# Altium PCB PCB.PcbDoc (part 1 of 2)
Units mm, origin at the board's own origin, x right, y up, seen from the top; angles counter-clockwise.
Board outline 90 x 38 mm, 2 copper layers (Top Layer, Bottom Layer), stack 1.499 mm thick; 46 components, 39 nets, 189 pads, 43 vias.
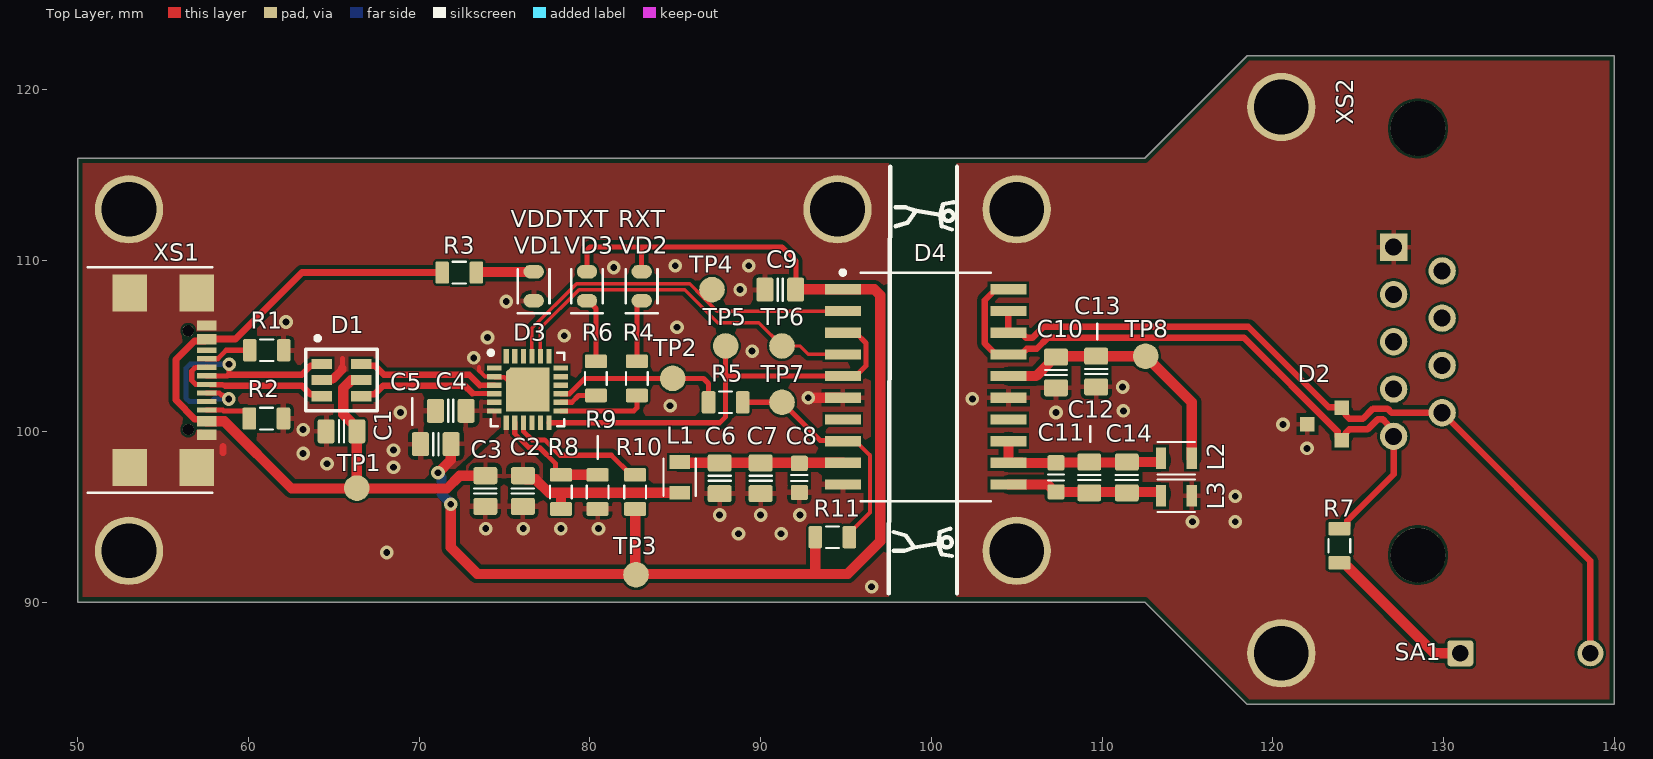
[diagram p0: Top Layer view]
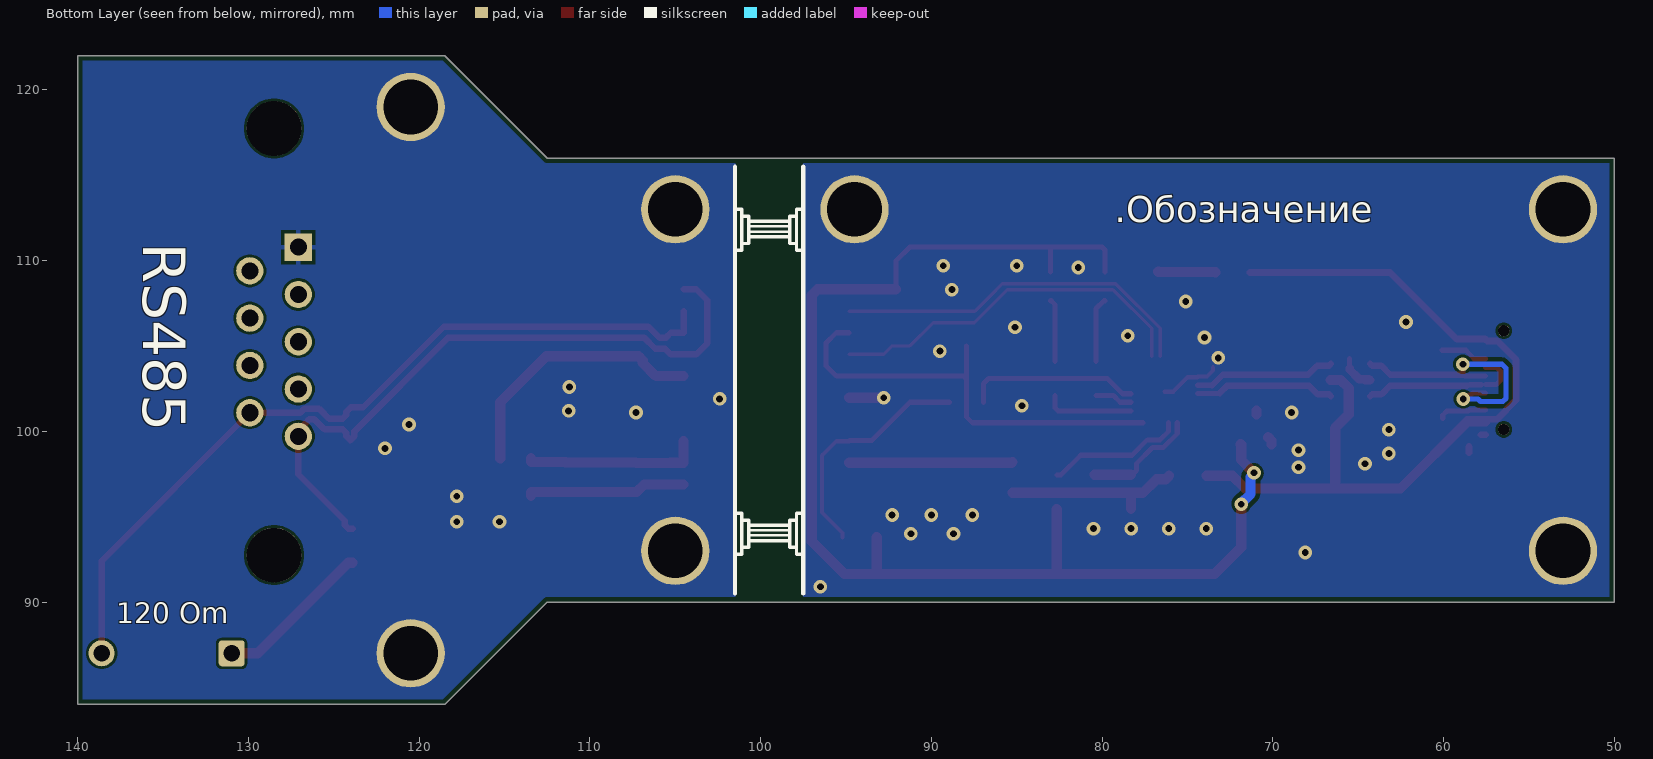
[diagram p1: Bottom Layer view, seen from below]
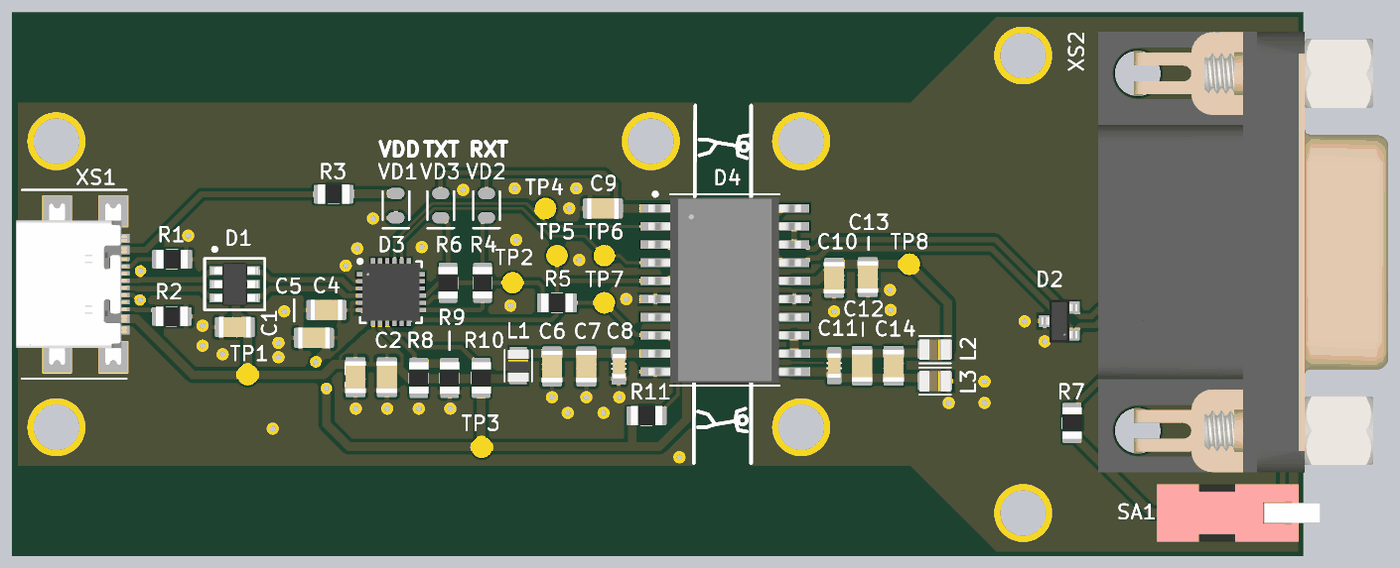
[diagram p2: 3D render of the assembled board from above, using the file's embedded part models]

## Layer stack, top to bottom
Top Solder: solder mask 0.0102, Solder Resist, Dk 3.5
Top Layer: signal copper 0.0175
Dielectric 1: dielectric 1.464, FR-4, Dk 4.8
Bottom Layer: signal copper 0.0175
Bottom Solder: solder mask 0.0102, Solder Resist, Dk 3.5

## Board outline
50,90 50,116 112.5,116 118.5,122 140,122 140,84 118.5,84 112.5,90

## Design rules (kind name [scope] priority, off if disabled: settings)
BoardOutlineClearance [All] p1: gap=0.3 ignorepadtopadclearanceinfootprint=FALSE
Clearance Clearance_1 [InNet('GND') And OnMid vs OnMid] p1: gap=0.15 ignorepadtopadclearanceinfootprint=FALSE except(0.2: Hole-Hole; 0.25: Arc-Fill Arc-Poly Arc-Region Track-Fill Track-Poly Track-Region Fill-Text Poly-Text Region-Text) sourcerule=63 cellrowname=GND cellrowtype=1 cellcolname=All cellcoltype=0 innerlayers=TRUE
Clearance Clearance_2 [InNet('GND') And (ExistsOnLayer('Top Layer') Or ExistsOnLayer('Bottom Layer')) vs (ExistsOnLayer('Top Layer') Or ExistsOnLayer('Bottom Layer'))] p2: gap=0.15 ignorepadtopadclearanceinfootprint=FALSE except(0.2: Hole-Hole; 0.25: Arc-Fill Arc-Poly Arc-Region Track-Fill Track-Poly Track-Region Fill-Text Poly-Text Region-Text) sourcerule=63 cellrowname=GND cellrowtype=1 cellcolname=All cellcoltype=0 outerlayers=TRUE
Clearance Clearance_3 [InNet('GND')] p3: gap=0.254 ignorepadtopadclearanceinfootprint=FALSE sourcerule=63 cellrowname=GND cellrowtype=1 cellcolname=All cellcoltype=0
Clearance Clearance_1 [InNet('GND_ISO') And OnMid vs OnMid] p4: gap=0.15 ignorepadtopadclearanceinfootprint=FALSE except(0.2: Hole-Hole; 0.25: Arc-Fill Arc-Poly Arc-Region Track-Fill Track-Poly Track-Region Fill-Text Poly-Text Region-Text) sourcerule=63 cellrowname=GND_ISO cellrowtype=1 cellcolname=All cellcoltype=0 innerlayers=TRUE
Clearance Clearance_2 [InNet('GND_ISO') And (ExistsOnLayer('Top Layer') Or ExistsOnLayer('Bottom Layer')) vs (ExistsOnLayer('Top Layer') Or ExistsOnLayer('Bottom Layer'))] p5: gap=0.15 ignorepadtopadclearanceinfootprint=FALSE except(0.2: Hole-Hole; 0.25: Arc-Fill Arc-Poly Arc-Region Track-Fill Track-Poly Track-Region Fill-Text Poly-Text Region-Text) sourcerule=63 cellrowname=GND_ISO cellrowtype=1 cellcolname=All cellcoltype=0 outerlayers=TRUE
Clearance Clearance_3 [InNet('GND_ISO')] p6: gap=0.254 ignorepadtopadclearanceinfootprint=FALSE sourcerule=63 cellrowname=GND_ISO cellrowtype=1 cellcolname=All cellcoltype=0
Clearance Clearance_1 [OnMid vs OnMid] p7: gap=0.15 ignorepadtopadclearanceinfootprint=FALSE sourcerule=63 cellrowname=All cellrowtype=0 cellcolname=All cellcoltype=0 innerlayers=TRUE
Clearance Clearance_2 [(ExistsOnLayer('Top Layer') Or ExistsOnLayer('Bottom Layer')) vs (ExistsOnLayer('Top Layer') Or ExistsOnLayer('Bottom Layer'))] p8: gap=0.15 ignorepadtopadclearanceinfootprint=FALSE sourcerule=63 cellrowname=All cellrowtype=0 cellcolname=All cellcoltype=0 outerlayers=TRUE
Clearance [All] p9: gap=0.254 ignorepadtopadclearanceinfootprint=FALSE ismatrix=TRUE miname0=GND mitype0=1 miname1=GND_ISO mitype1=1
DiffPairsRouting "Schematic Differential Pairs Routing_1" [InDifferentialPair('D_USB_D')] p1: maxlimit=0.254 minlimit=0.15 mostfreqgap=0.254 toplayer_minwidth=0.3 toplayer_maxwidth=0.381 toplayer_prefwidth=0.381 bottomlayer_minwidth=0.3 bottomlayer_maxwidth=0.381 bottomlayer_prefwidth=0.381 maxuncoupledlength=12.7
DiffPairsRouting "Schematic Differential Pairs Routing" [InDifferentialPair('D_D')] p2: maxlimit=0.254 minlimit=0.15 mostfreqgap=0.254 toplayer_minwidth=0.15 toplayer_maxwidth=0.381 toplayer_prefwidth=0.381 bottomlayer_minwidth=0.15 bottomlayer_maxwidth=0.381 bottomlayer_prefwidth=0.381 maxuncoupledlength=12.7
DiffPairsRouting [All] p3: maxlimit=0.254 minlimit=0.254 mostfreqgap=0.254 toplayer_minwidth=0.381 toplayer_maxwidth=0.381 toplayer_prefwidth=0.381 bottomlayer_minwidth=0.381 bottomlayer_maxwidth=0.381 bottomlayer_prefwidth=0.381 maxuncoupledlength=12.7
HoleSize [All] p1: absolutevalues=TRUE maxlimit=3.5 minlimit=0.3 maxpercent=80.000 minpercent=20.000
HoleToHoleClearance [All] p1: gap=0.2 allowstackedmicrovias=TRUE
MatchedLengths "Schematic Matched Net Lengths" [InDifferentialPair('D_USB_D')] p1: tolerance=10 checknetsindiffpair=TRUE checkdiffpairvsdiffpair=FALSE checkxsignals=FALSE checkothers=FALSE
MatchedLengths "Schematic Matched Net Lengths_1" [InDifferentialPair('D_D')] p2: tolerance=4 checknetsindiffpair=TRUE checkdiffpairvsdiffpair=FALSE checkxsignals=FALSE checkothers=FALSE
MatchedLengths "Schematic Matched Net Lengths_2" [InDifferentialPair('D_RS485')] p3: tolerance=10 checknetsindiffpair=TRUE checkdiffpairvsdiffpair=FALSE checkxsignals=FALSE checkothers=FALSE
MaxMinImpedance "Schematic Impedance Constraint_1" [InDifferentialPair('D_USB_D')] p1: minimum=81.00 maximum=99.00
MaxMinImpedance "Schematic Impedance Constraint" [InDifferentialPair('D_D')] p2: minimum=81.00 maximum=99.00
MaxMinImpedance "Schematic Impedance Constraint_2" [InDifferentialPair('D_RS485')] p3: minimum=108.0 maximum=132.0
MinimumSolderMaskSliver [All] p1: minsoldermaskwidth=0.1
PolygonConnect "Schematic Polygon Connect Style_2" [InNet('EN_DC')] p1: connectstyle=Relief reliefconductorwidth=0.3 reliefentries=4 polygonreliefangle="90 Angle" airgapwidth=0.2
PolygonConnect "Schematic Polygon Connect Style_1" [InNet('GND')] p2: thpad.connectstyle=Relief thpad.reliefconductorwidth=0.3 thpad.reliefentries=4 thpad.polygonreliefangle="90 Angle" thpad.airgapwidth=0.2 smdpad.connectstyle=Relief smdpad.reliefconductorwidth=0.3 smdpad.reliefentries=4 smdpad.polygonreliefangle="90 Angle" smdpad.airgapwidth=0.2 via.connectstyle=Direct via.reliefconductorwidth=0.254 via.reliefentries=4 via.polygonreliefangle="90 Angle" via.airgapwidth=0.254
PolygonConnect "Schematic Polygon Connect Style" [InNet('GND_ISO')] p3: thpad.connectstyle=Relief thpad.reliefconductorwidth=0.3 thpad.reliefentries=4 thpad.polygonreliefangle="90 Angle" thpad.airgapwidth=0.2 smdpad.connectstyle=Relief smdpad.reliefconductorwidth=0.3 smdpad.reliefentries=4 smdpad.polygonreliefangle="90 Angle" smdpad.airgapwidth=0.2 via.connectstyle=Direct via.reliefconductorwidth=0.254 via.reliefentries=4 via.polygonreliefangle="90 Angle" via.airgapwidth=0.254
PolygonConnect [All] p4: connectstyle=Relief reliefconductorwidth=0.254 reliefentries=4 polygonreliefangle="90 Angle" airgapwidth=0.254
RoutingVias [All] p1: holewidth=0.4 width=0.8 viastyle="Through Hole" minholewidth=0.4 minwidth=0.8 maxholewidth=0.4 maxwidth=0.8
SilkToSilkClearance [All] p1: silktosilkclearance=0.15
SilkToSolderMaskClearance [IsPad] p1: minsilkscreentomaskgap=0.15 clearancetoexposedcopper=TRUE
SolderMaskExpansion [All] p1: expansion=0.025 istentingtop=FALSE
Width "Schematic Width Constraint_1" [InNet('EN_DC')] p1: maxlimit=0.5 minlimit=0.15 preferedwidth=0.3 minimp=50.000000 maximp=50.000000 favimp=50.000000
Width "Schematic Width Constraint_8" [InNet('NetC11_1')] p2: maxlimit=0.6 minlimit=0.15 preferedwidth=0.3 minimp=50.000000 maximp=50.000000 favimp=50.000000
Width "Schematic Width Constraint_6" [InNet('GND')] p3: maxlimit=0.6 minlimit=0.25 preferedwidth=0.4 minimp=50.000000 maximp=50.000000 favimp=50.000000
Width "Schematic Width Constraint_7" [InNet('GND_ISO')] p4: maxlimit=0.25 minlimit=0.25 preferedwidth=0.25 minimp=50.000000 maximp=50.000000 favimp=50.000000
Width "Schematic Width Constraint_5" [InNet('TXD')] p5: maxlimit=0.6 minlimit=0.2 preferedwidth=0.3 minimp=50.000000 maximp=50.000000 favimp=50.000000
Width "Schematic Width Constraint_4" [InNet('RXD')] p6: maxlimit=0.6 minlimit=0.2 preferedwidth=0.3 minimp=50.000000 maximp=50.000000 favimp=50.000000
Width "Schematic Width Constraint_3" [InNet('VBUS')] p7: maxlimit=0.6 minlimit=0.15 preferedwidth=0.4 minimp=50.000000 maximp=50.000000 favimp=50.000000
Width "Schematic Width Constraint_2" [InNet('VBUS_D')] p8: maxlimit=0.6 minlimit=0.2 preferedwidth=0.3 minimp=50.000000 maximp=50.000000 favimp=50.000000
Width "Schematic Width Constraint" [InNet('Visoout')] p9: maxlimit=0.6 minlimit=0.2 preferedwidth=0.4 minimp=50.000000 maximp=50.000000 favimp=50.000000
Width [All] p10: maxlimit=0.6 minlimit=0.15 preferedwidth=0.3 minimp=50.000000 maximp=50.000000 favimp=50.000000
24 further rules are at their usual default settings.

## Classes and differential pairs
polygon class GND: GND_L02_P002
polygon class Power: VBUS_L01_P000
component class U_USB_to_UART: C6 C7 C8 C9 C10 C11 C12 C13 C14 D4 L1 L2 L3 R11
component class U_USBtoUART: C2 C3 C4 C5 D3 R8 R9 R10
component class MAIN: C1 D1 D2 R1 R2 R3 R4 R5 R6 R7 SA1 TP1 TP2 TP3 TP4 TP5 TP6 TP7 TP8 VD1 VD2 VD3 XS1 XS2
differential pair D_USB_D: +USB_D_P -USB_D_N
differential pair D_D: +D_P -D_N
differential pair D_RS485: +RS485_P -RS485_N

## Components (designator, comment, footprint, x,y, rotation, side; value= is the part's Value field where it differs from the comment)
C1 "100 нФ" CAPC2012X135N 65.45,100 r0 top value=100n
C2 "100 нФ" CAPC2012X135N 76.075,96.5 r90 top value=100n
C3 "4,7 мкФ" CAPC2012X135N 73.875,96.5 r90 top value=4.7u
C4 "100 нФ" CAPC2012X135N 71.85,101.2 r0 top value=100n
C5 "4,7 мкФ" CAPC2012X135N 70.975,99.25 r0 top value=4.7u
C6 "10 мкФ" CAPC2012X135N 87.599,97.25 r90 top value=10u
C7 "1 мкФ" CAPC2012X135N 89.999,97.25 r90 top value=1u
C8 "10 нФ" CAPC1608X90N 92.268,97.269 r90 top value=10n
C9 "100 нФ" CAPC2012X135N 91.15,108.3 r0 top value=100n
C10 "100 нФ" CAPC2012X135N 107.299,103.45 r90 top value=100n
C11 "10 нФ" CAPC1608X90N 107.3,97.3 r90 top value=10n
C12 "1 мкФ" CAPC2012X135N 109.25,97.3 r90 top value=1u
C13 "10 мкФ" CAPC2012X135N 109.65,103.5 r90 top value=10u
C14 "10 мкФ" CAPC2012X135N 111.45,97.3 r90 top value=10u
D1 "USBLC6-2SC6" ST_SOT23-6L 65.45,103 r0 top
D2 "CDSOT23-SM712" BOURNS_CDSOT23_SM712 123.025,100.425 r90 top
D3 "CP2102N-A02-GQFN24" CP2102N-A02-GQFN24_DS15 76.35,102.45 r0 top
D4 "ISOW1432DFMR" TI_DFM0020A 99.666,102.6 r0 top
L1 "600 Ом @ 100 МГц" TDK_MPZ2012S_2012 85.25,97.3 r270 top
L2 "330 Ом @ 100 МГц" Murata_BLM21PG_2012_Reflow 114.35,98.425 r180 top
L3 "330 Ом @ 100 МГц" Murata_BLM21PG_2012_Reflow 114.35,96.225 r180 top
R1 "5,1 кОм" RESC2012X70N 61.075,104.75 r0 top value=5.1k
R2 "5,1 кОм" RESC2012X70N 61.05,100.75 r180 top value=5.1k
R3 "330 Ом" RESC2012X70N 72.35,109.3 r0 top value=330R
R4 "10 кОм" RESC2012X70N 82.75,103.1 r90 top value=10k
R5 "0 Ом" RESC2012X70N 87.95,101.7 r0 top value=0R
R6 "10 кОм" RESC2012X70N 80.35,103.1 r90 top value=10k
R7 "120 Ом" RESC2012X70N 123.9,93.3 r90 top value=120R
R8 "22 кОм" RESC2012X70N 78.3,96.45 r270 top value=22k
R9 "47 кОм" RESC2012X70N 80.45,96.45 r90 top value=47k
R10 "1 кОм" RESC2012X70N 82.65,96.45 r270 top value=1k
R11 "4,7 кОм" RESC2012X70N 94.2,93.8 r180 top value=4.7k
SA1 "DS1040-01RT" CONNFLY_DS1040_01RT 134.79,87 r90 top
TP1 "D1.5mm" TestPoint_Pad_D1.5mm 66.35,96.675 r0 top
TP2 "D1.5mm" TestPoint_Pad_D1.5mm 84.85,103.1 r90 top
TP3 "D1.5mm" TestPoint_Pad_D1.5mm 82.7,91.6 r90 top
TP4 "D1.5mm" TestPoint_Pad_D1.5mm 87.15,108.3 r90 top
TP5 "D1.5mm" TestPoint_Pad_D1.5mm 87.95,105 r90 top
TP6 "D1.5mm" TestPoint_Pad_D1.5mm 91.25,105 r90 top
TP7 "D1.5mm" TestPoint_Pad_D1.5mm 91.25,101.7 r90 top
TP8 "D1.5mm" TestPoint_Pad_D1.5mm 112.55,104.4 r90 top
VD1 "TO-2013BC-PG" LED_OA2013_080_090_1C2A 76.705,108.5 r270 top
VD2 "TO-2013BC-PG" LED_OA2013_080_090_1C2A 83.03,108.5 r270 top
VD3 "TO-2013BC-PG" LED_OA2013_080_090_1C2A 79.83,108.5 r270 top
XS1 "USB Type-C" USB4110-GF-A_GCT 54.187,103 r270 top
XS2 "D-SUB 9F" CONNFLY_DS1037_01_09F 128.5,105.245 r90 top

## Footprints (in the part's own frame and the unit in brackets; to place one, negate y for a bottom-side part, rotate by r counter-clockwise, add the part's x,y. Pads: shape width x height; smd on the part's side, far side on the other; paste and mask are expansions set on the pad)
BOURNS_CDSOT23_SM712 [mm] "Bourns CDSOT23-SM712 datasheet land pattern; pads0.85x0.85mm, rows2.0mm, pitch1.90mm; UL STEP"
  rect 0.85x0.85 smd paste+0 mask+0.05: 1(-0.95,-1) 2(0.95,-1) 3(0,1)
  body extent -1.5,-1.24 1.5,1.24, height 1.17
CAPC1608X90N [mm] "Chip Capacitor, Body 1.6x0.8mm, EIA 0603, IPC Medium Density"
  round 0.254 on Mech15: 0(0,0)
  rrect25% 0.9x1 smd: 1(-0.85,0) 2(0.85,0)
  Top Layer pour cut-out: -0.6,0.5 -0.4,0.7 0.4,0.7 0.6,0.5 0.6,-0.5 0.4,-0.7 -0.4,-0.7 -0.6,-0.5
  silkscreen extent -0.18,-0.48 0.18,0.48, body extent -0.85,-0.45 0.85,0.45, height 0.89
CAPC2012X135N [mm] "Chip Capacitor, Body 2.0x1.2mm, EIA 0805, IPC Medium Density"
  round 0.254 on Mech15: 0(0,0)
  rrect25% 1x1.4 smd: 1(-0.9,0) 2(0.9,0)
  Top Layer pour cut-out: -0.675,0.7 -0.475,0.9 0.475,0.9 0.675,0.7 0.675,-0.7 0.475,-0.9 -0.475,-0.9 -0.675,-0.7
  silkscreen extent -0.15,-0.65 0.15,0.65, body extent -1.1,-0.72 1.1,0.73, height 1.34
CONNFLY_DS1037_01_09F [mm] "CONNFLY DS1037-01-09F female right angle 9.4mm; PTH1.0 pads1.6 pitch2.77x2.84; NPTH3.2 spacing24.99; user STEP"
  rect 1.6x1.6 hole 1 paste-2539.97 mask+0.05: 1(5.54,1.42)
  round 1.6 hole 1 paste-2539.97 mask+0.05: 2(2.77,1.42) 3(0,1.42) 4(-2.77,1.42) 5(-5.54,1.42) 6(4.155,-1.42) 7(1.385,-1.42) 8(-1.385,-1.42) 9(-4.155,-1.42)
  round 3.2 hole 3.2 unplated paste-2539.97 mask+0.05: ""(-12.495,0) ""(12.495,0)
  body extent -15.4,-17.49 15.4,2.76, height 12.5
CONNFLY_DS1040_01RT [mil] "Connfly DS1040-01RT piano SPST; pitch7.62mm PTH0.97mm pad1.524mm; EasyEDA STEP approximate height8.8 vs drawing8.0mm"
  rrect25% 60x60 hole 38.19 paste-99999 mask+1.97: 1(0,150)
  round 60 hole 38.19 paste-99999 mask+1.97: 2(0,-150)
  body extent -79,-254 79,195, height 346
CP2102N-A02-GQFN24_DS15 [mm] "User derivative of official UL A01 export; CP2102N-A02 QFN24 datasheet Rev1.5 Fig7.2; EP25 C0.25"
  rect 0.85x0.3 smd paste+0 mask+0.06: 1(-1.95,1.25) 2(-1.95,0.75) 3(-1.95,0.25) 4(-1.95,-0.25) 5(-1.95,-0.75) 6(-1.95,-1.25) 13(1.95,-1.25) 14(1.95,-0.75) 15(1.95,-0.25) 16(1.95,0.25) 17(1.95,0.75) 18(1.95,1.25)
  rect 0.3x0.85 smd paste+0 mask+0.06: 7(-1.25,-1.95) 8(-0.75,-1.95) 9(-0.25,-1.95) 10(0.25,-1.95) 11(0.75,-1.95) 12(1.25,-1.95) 19(1.25,1.95) 20(0.75,1.95) 21(0.25,1.95) 22(-0.25,1.95) 23(-0.75,1.95) 24(-1.25,1.95)
  rect 0.354x0.354 smd rot 45 paste-2 mask+0.06: 25(-1.025,1.025)
  rect 2.55x2.3 smd paste-2 mask+0.06: 25(0,-0.125)
  rect 2.3x2.55 smd paste-2 mask+0.06: 25(0.125,0)
  silkscreen extent -2.27,-2.15 2.15,2.27, body extent -2,-2 2,2, height 0.8
LED_OA2013_080_090_1C2A [mm] "manufacturer recommended; PG/MRE 2017; pad 0.8x1.2 gap 0.9mm; 1=K right 2=A left; generic standard 3D, not exact Oasistek"
  oval 0.8x1.2 smd paste+0 mask+0.05: 1(0.85,0) 2(-0.85,0)
  silkscreen extent -1,-0.93 1.58,0.93, body extent -1,-0.63 1,0.63, height 0.8
Murata_BLM21PG_2012_Reflow [mm] "Murata BLM21PG; reflow land pattern 0.6x1.25mm gap1.2mm; check current-dependent feed copper in ENFA0005 section12.1"
  rect 0.6x1.25 smd paste+0 mask+0.05: 1(-0.9,0) 2(0.9,0)
  silkscreen extent -1.1,-0.95 1.1,0.95, body extent -1.1,-0.72 1.1,0.72, height 1.05
RESC2012X70N [mm] "Chip Resistor, Body 2.0x1.2mm, EIA 0805, IPC Medium Density"
  round 0.254 on Mech15: 0(0,0)
  rrect25% 0.8x1.3 smd: 1(-1,0) 2(1,0)
  Top Layer pour cut-out: -0.725,0.65 -0.525,0.85 0.525,0.85 0.725,0.65 0.725,-0.65 0.525,-0.85 -0.525,-0.85 -0.725,-0.65
  silkscreen extent -0.38,-0.64 0.38,0.64, body extent -1.1,-0.67 1.1,0.68, height 0.69
ST_SOT23-6L [mm] "SOT23, 6-Leads, Body 2.93x2.80mm, Pitch 0.95mm, IPC Medium Density"
  rect 1.2x0.6 smd: 1(-1.15,0.95) 2(-1.15,0) 3(-1.15,-0.95) 4(1.15,-0.95) 5(1.15,0) 6(1.15,0.95)
  silkscreen extent -2.1,-1.8 2.1,2.57, body extent -1.6,-1.53 1.6,1.53, height 1.45
TDK_MPZ2012S_2012 [mm] "TDK MPZ2012S; reflow land pattern 0.8x1.2mm gap1.0mm; UL STEP height1.10mm (datasheet max1.05mm)"
  rect 0.8x1.2 smd paste+0 mask+0.05: 1(-0.9,0) 2(0.9,0)
  silkscreen extent -1.1,-0.95 1.1,0.95, body extent -1.1,-0.72 1.1,0.72, height 1.1
TestPoint_Pad_D1.5mm [mm] "Test point; round copper pad D1.5mm; exposed mask; no paste, drill or silkscreen; Standard (No BOM)"
  round 1.5 smd paste-1.5 mask+0.05: 1(0,0)
TI_DFM0020A [mm] "TI DFM0020A SOIC20 for ISOW1432DFMR; TI land pattern 2.1x0.6mm, pitch1.27mm, rows9.7mm"
  rect 2.1x0.6 smd paste+0 mask+0.05: 1(-4.85,5.715) 2(-4.85,4.445) 3(-4.85,3.175) 4(-4.85,1.905) 5(-4.85,0.635) 6(-4.85,-0.635) 7(-4.85,-1.905) 8(-4.85,-3.175) 9(-4.85,-4.445) 10(-4.85,-5.715) 11(4.85,-5.715) 12(4.85,-4.445) 13(4.85,-3.175) 14(4.85,-1.905) 15(4.85,-0.635) 16(4.85,0.635) 17(4.85,1.905) 18(4.85,3.175) 19(4.85,4.445) 20(4.85,5.715)
  silkscreen extent -4.97,-6.7 3.8,6.82, body extent -5.32,-6.46 5.32,6.46, height 3.56
USB4110-GF-A_GCT [mil] "GCT USB4110-GF-A; corrected shell mask +0.05mm/paste 0mm; embedded community STEP"
  round 26 hole 26 unplated paste-99999 mask+0: 13(-113.78,90.07) 14(113.78,90.07)
  rect 24x45 smd paste+0 mask+0: A1/B12(-125.98,132.39) A4/B9(-94.49,132.39) A9/B4(94.49,132.39) A12/B1(125.98,132.39)
  rect 12x45 smd paste+0 mask+0: A5(-49.21,132.39) A6(-9.84,132.39) A7(9.84,132.39) A8(49.21,132.39) B5(68.9,132.39) B6(29.53,132.39) B7(-29.53,132.39) B8(-68.9,132.39)
  rect 85x79 smd paste+0 mask+1.97: SH(-201.18,109.76) SH(-201.18,-44.97) SH(201.18,109.76) SH(201.18,-44.97)
  silkscreen extent -260,-142 260,146, body extent -222,-157 222,146, height 128

## Part data
C1 C2 C4: library part C0132, "Конденсатор 100 нФ ±20% 100 В X7R 0805", CapacitanceNominalF=1E-7, DFTestFrequencyHz=1000, DFTestTemperatureC=20, DFTestVoltageVrms=1, Dielectric=X7R, EquivalentSeriesResistanceOhm=39.7887357729738, InsulationResistanceMinOhm=5000000000, InsulationTestVoltageV=100, Manufacturer=YAGEO, MPN=CC0805MKX7R0BB104, Package=0805, Tolerance=±20%, Voltage="100 В", CommentBase="Конденсатор 100 нФ ±20% 100 В X7R 0805", ComponentLink1Description="Даташит — локальный", ComponentLink1URL=C:\Users\Nomatin\Documents\Altium\MY_LIB\MY_LIB\Datasheets\YAGEO_CC_X7R.pdf, ComponentLink2Description="Даташит — производитель", ComponentLink2URL=https://yageogroup.com/content/datasheet/asset/file/UPY-GPHC_X7R_6_3V-TO-250V, Datasheet=C:\Users\Nomatin\Documents\Altium\MY_LIB\MY_LIB\Datasheets\YAGEO_CC_X7R.pdf, DissipationFactorMax=0.025, ESKD_value="100 нФ", HelpURL=C:\Users\Nomatin\Documents\Altium\MY_LIB\MY_LIB\Datasheets\YAGEO_CC_X7R.pdf, ID=C0132, InsulationTestDurationS=60, InsulationTimeConstantMinS=500, Notes="YAGEO CC; список 20.10.2026", Type=Конденсатор
C3 C5: library part C0140, "Конденсатор 4,7 мкФ ±20% 25 В X7R 0805", CapacitanceNominalF=4.7E-6, DFTestFrequencyHz=1000, DFTestTemperatureC=20, DFTestVoltageVrms=1, Dielectric=X7R, EquivalentSeriesResistanceOhm=3.38627538493394, InsulationResistanceMinOhm=21276595.7446809, InsulationTestVoltageV=25, Manufacturer=YAGEO, MPN=CC0805MKX7R8BB475, Package=0805, Tolerance=±20%, Voltage="25 В", CommentBase="Конденсатор 4,7 мкФ ±20% 25 В X7R 0805", ComponentLink1Description="Даташит — локальный", ComponentLink1URL=C:\Users\Nomatin\Documents\Altium\MY_LIB\MY_LIB\Datasheets\YAGEO_CC_X7R.pdf, ComponentLink2Description="Даташит — производитель", ComponentLink2URL=https://yageogroup.com/content/datasheet/asset/file/UPY-GPHC_X7R_6_3V-TO-250V, Datasheet=C:\Users\Nomatin\Documents\Altium\MY_LIB\MY_LIB\Datasheets\YAGEO_CC_X7R.pdf, DissipationFactorMax=0.1, ESKD_value="4,7 мкФ", HelpURL=C:\Users\Nomatin\Documents\Altium\MY_LIB\MY_LIB\Datasheets\YAGEO_CC_X7R.pdf, ID=C0140, InsulationTestDurationS=60, InsulationTimeConstantMinS=100, Notes="YAGEO CC; список 20.10.2026", Type=Конденсатор
C6 C13 C14: library part C0141, "Конденсатор 10 мкФ ±20% 16 В X7R 0805", CapacitanceNominalF=1E-5, DFTestFrequencyHz=1000, DFTestTemperatureC=20, DFTestVoltageVrms=1, Dielectric=X7R, EquivalentSeriesResistanceOhm=1.59154943091895, InsulationResistanceMinOhm=10000000, InsulationTestVoltageV=16, Manufacturer=YAGEO, MPN=CC0805MKX7R7BB106, Package=0805, Tolerance=±20%, Voltage="16 В", CommentBase="Конденсатор 10 мкФ ±20% 16 В X7R 0805", ComponentLink1Description="Даташит — локальный", ComponentLink1URL=C:\Users\Nomatin\Documents\Altium\MY_LIB\MY_LIB\Datasheets\YAGEO_CC_X7R.pdf, ComponentLink2Description="Даташит — производитель", ComponentLink2URL=https://yageogroup.com/content/datasheet/asset/file/UPY-GPHC_X7R_6_3V-TO-250V, Datasheet=C:\Users\Nomatin\Documents\Altium\MY_LIB\MY_LIB\Datasheets\YAGEO_CC_X7R.pdf, DissipationFactorMax=0.1, ESKD_value="10 мкФ", HelpURL=C:\Users\Nomatin\Documents\Altium\MY_LIB\MY_LIB\Datasheets\YAGEO_CC_X7R.pdf, ID=C0141, InsulationTestDurationS=60, InsulationTimeConstantMinS=100, Notes="YAGEO CC; список 20.10.2026", Type=Конденсатор
C7 C12: library part C0138, "Конденсатор 1 мкФ ±20% 100 В X7R 0805", CapacitanceNominalF=1E-6, DFTestFrequencyHz=1000, DFTestTemperatureC=20, DFTestVoltageVrms=1, Dielectric=X7R, EquivalentSeriesResistanceOhm=7.95774715459477, InsulationResistanceMinOhm=500000000, InsulationTestVoltageV=100, Manufacturer=YAGEO, MPN=CC0805MKX7R0BB105, Package=0805, Tolerance=±20%, Voltage="100 В", CommentBase="Конденсатор 1 мкФ ±20% 100 В X7R 0805", ComponentLink1Description="Даташит — локальный", ComponentLink1URL=C:\Users\Nomatin\Documents\Altium\MY_LIB\MY_LIB\Datasheets\YAGEO_CC_X7R.pdf, ComponentLink2Description="Даташит — производитель", ComponentLink2URL=https://yageogroup.com/content/datasheet/asset/file/UPY-GPHC_X7R_6_3V-TO-250V, Datasheet=C:\Users\Nomatin\Documents\Altium\MY_LIB\MY_LIB\Datasheets\YAGEO_CC_X7R.pdf, DissipationFactorMax=0.05, ESKD_value="1 мкФ", HelpURL=C:\Users\Nomatin\Documents\Altium\MY_LIB\MY_LIB\Datasheets\YAGEO_CC_X7R.pdf, ID=C0138, InsulationTestDurationS=60, InsulationTimeConstantMinS=500, Notes="YAGEO CC; список 20.10.2026", Type=Конденсатор
C8 C11: library part C0219, "Конденсатор 10 нФ ±10% 100 В X7R 0603", CapacitanceNominalF=1E-8, DFTestFrequencyHz=1000, DFTestTemperatureC=20, DFTestVoltageVrms=1, Dielectric=X7R, EquivalentSeriesResistanceOhm=397.887357729738, InsulationResistanceMinOhm=10000000000, InsulationTestVoltageV=100, Manufacturer=YAGEO, MPN=CC0603KRX7R0BB103, Package=0603, Tolerance=±10%, Voltage="100 В", CommentBase="Конденсатор 10 нФ ±10% 100 В X7R 0603", ComponentLink1Description="Даташит — локальный", ComponentLink1URL=C:\Users\Nomatin\Documents\Altium\MY_LIB\MY_LIB\Datasheets\YAGEO_CC_X7R.pdf, ComponentLink2Description="Даташит — производитель", ComponentLink2URL=https://yageogroup.com/content/datasheet/asset/file/UPY-GPHC_X7R_6_3V-TO-250V, Datasheet=C:\Users\Nomatin\Documents\Altium\MY_LIB\MY_LIB\Datasheets\YAGEO_CC_X7R.pdf, DissipationFactorMax=0.025, ESKD_value="10 нФ", HelpURL=C:\Users\Nomatin\Documents\Altium\MY_LIB\MY_LIB\Datasheets\YAGEO_CC_X7R.pdf, ID=C0219, InsulationTestDurationS=60, InsulationTimeConstantMinS=500, Notes="YAGEO CC; список 20.10.2026", Type=Конденсатор
C9 C10: library part C0094, "Конденсатор 100 нФ ±10% 100 В X7R 0805", CapacitanceNominalF=1E-7, DFTestFrequencyHz=1000, DFTestTemperatureC=20, DFTestVoltageVrms=1, Dielectric=X7R, EquivalentSeriesResistanceOhm=39.7887357729738, InsulationResistanceMinOhm=5000000000, InsulationTestVoltageV=100, Manufacturer=YAGEO, MPN=CC0805KKX7R0BB104, Package=0805, Tolerance=±10%, Voltage="100 В", CommentBase="Конденсатор 100 нФ ±10% 100 В X7R 0805", ComponentLink1Description="Даташит — локальный", ComponentLink1URL=C:\Users\Nomatin\Documents\Altium\MY_LIB\MY_LIB\Datasheets\YAGEO_CC_X7R.pdf, ComponentLink2Description="Даташит — производитель", ComponentLink2URL=https://yageogroup.com/content/datasheet/asset/file/UPY-GPHC_X7R_6_3V-TO-250V, Datasheet=C:\Users\Nomatin\Documents\Altium\MY_LIB\MY_LIB\Datasheets\YAGEO_CC_X7R.pdf, DissipationFactorMax=0.025, ESKD_value="100 нФ", HelpURL=C:\Users\Nomatin\Documents\Altium\MY_LIB\MY_LIB\Datasheets\YAGEO_CC_X7R.pdf, ID=C0094, InsulationTestDurationS=60, InsulationTimeConstantMinS=500, Notes="YAGEO CC; список 20.10.2026", Type=Конденсатор
D1: library part U0003, "Микросхема USBLC6-2SC6", JunctionTemperatureMax=150, JunctionTemperatureMin=-40, Manufacturer=STMicroelectronics, Package=SOT23-6L, StorageTemperatureMin=-55, TemperatureReference="Tj (junction), °C; Table 1 absolute ratings", Voltage="5.25 V (VRM)", CommentBase="Микросхема USBLC6-2SC6", ComponentLink1Description="Даташит — локальный", ComponentLink1URL=C:\Users\Nomatin\Documents\Altium\MY_LIB\MY_LIB\Datasheets\USBLC6-2_ST.pdf, ComponentLink2Description="Даташит — производитель", ComponentLink2URL=https://www.st.com/resource/en/datasheet/usblc6-2.pdf, Datasheet=C:\Users\Nomatin\Documents\Altium\MY_LIB\MY_LIB\Datasheets\USBLC6-2_ST.pdf, DatasheetRevision="DS4260 Rev 7, December 2021", ESKD_value=USBLC6-2SC6, HelpURL=C:\Users\Nomatin\Documents\Altium\MY_LIB\MY_LIB\Datasheets\USBLC6-2_ST.pdf, ID=U0003, MPN=USBLC6-2SC6, Notes="ESD-защита двух линий USB. Tj −40…+150 °C (не TA), табл. 1 absolute ratings. I/O1=1,6; I/O2=3,4; GND=2; VBUS=5.", OperatingTemperatureMax=150, OperatingTemperatureMin=-40, StorageTemperatureMax=150, Type=Микросхема
D2: library part U0005, "TVS-сборка CDSOT23-SM712", Manufacturer=Bourns, OperatingTemperatureMax=150, OperatingTemperatureMin=-55, Package=SOT23-3, Power="400 Вт (импульс 8/20 мкс)", TemperatureReference="TOPR, °C; datasheet absolute ratings", Voltage="VWM: 7/12 В (по полярности)", CommentBase="TVS-сборка CDSOT23-SM712", ComponentLink1Description="Даташит — локальный", ComponentLink1URL=C:\Users\Nomatin\Documents\Altium\MY_LIB\MY_LIB\Datasheets\CDSOT23-SM712_Bourns.pdf, ComponentLink2Description="Даташит — производитель", ComponentLink2URL=https://www.bourns.com/docs/product-datasheets/cdsot23-sm712.pdf, Datasheet=C:\Users\Nomatin\Documents\Altium\MY_LIB\MY_LIB\Datasheets\CDSOT23-SM712_Bourns.pdf, DatasheetRevision="Rev. 06/24", ESKD_value=CDSOT23-SM712, HelpURL=C:\Users\Nomatin\Documents\Altium\MY_LIB\MY_LIB\Datasheets\CDSOT23-SM712_Bourns.pdf, ID=U0005, MPN=CDSOT23-SM712, Notes="RS-485 TVS: 1=I/O1, 2=I/O2, 3=GND. VWM: 3→1/2 — 7 В; 1/2→3 — 12 В. IPP 17 А, 8/20 мкс.", StorageTemperatureMax=150, StorageTemperatureMin=-55, Type=TVS-сборка
D3: library part U0002, "Микросхема CP2102N-A02-GQFN24", JunctionTemperatureMax=105, JunctionTemperatureMin=-40, Manufacturer="Silicon Labs", OperatingTemperatureMax=85, Package="QFN-24 4×4 mm, EP", StorageTemperatureMax=150, StorageTemperatureMin=-65, TemperatureReference="TA (ambient), °C; recommended operating", Voltage="3.0–3.6 V (VDD); 3.0–5.25 V (VREGIN)", CommentBase="Микросхема CP2102N-A02-GQFN24", ComponentLink1Description="Даташит — локальный", ComponentLink1URL=C:\Users\Nomatin\Documents\Altium\MY_LIB\MY_LIB\Datasheets\cp2102n-datasheet.pdf, ComponentLink2Description="Даташит — производитель", ComponentLink2URL=https://www.silabs.com/documents/public/data-sheets/cp2102n-datasheet.pdf, Datasheet=C:\Users\Nomatin\Documents\Altium\MY_LIB\MY_LIB\Datasheets\cp2102n-datasheet.pdf, DatasheetRevision="Rev. 1.5", ESKD_value=CP2102N-A02-GQFN24, HelpURL=C:\Users\Nomatin\Documents\Altium\MY_LIB\MY_LIB\Datasheets\cp2102n-datasheet.pdf, ID=U0002, MPN=CP2102N-A02-GQFN24, Notes="USB–UART, до 3 Мбод. EP=25 (GND). TA −40…+85 °C: табл. 3.1. Tj −40…+105 °C и хранение: absolute maximum, табл. 3.10.", OperatingTemperatureMin=-40, Type=Микросхема
D4: library part U0004, "Микросхема ISOW1432DFMR", JunctionTemperatureMax=150, JunctionTemperatureMin=-40, Manufacturer="Texas Instruments", OperatingTemperatureMax=125, Package="SOIC-20 DFM (7,5×12,83 мм)", StorageTemperatureMin=-65, TemperatureReference="TA (ambient), °C; recommended operating", Voltage="VIO: 1,71–1,89 / 2,25–5,5 В; VDD: 3–5,5 В", CommentBase="Микросхема ISOW1432DFMR", ComponentLink1Description="Даташит — локальный", ComponentLink1URL=C:\Users\Nomatin\Documents\Altium\MY_LIB\MY_LIB\Datasheets\ISOW1432_TI.pdf, ComponentLink2Description="Даташит — производитель", ComponentLink2URL=https://www.ti.com/lit/ds/symlink/isow1432.pdf, Datasheet=C:\Users\Nomatin\Documents\Altium\MY_LIB\MY_LIB\Datasheets\ISOW1432_TI.pdf, DatasheetRevision="SLLSF86D, August 2026", ESKD_value=ISOW1432DFMR, HelpURL=C:\Users\Nomatin\Documents\Altium\MY_LIB\MY_LIB\Datasheets\ISOW1432_TI.pdf, ID=U0004, MPN=ISOW1432DFMR, Notes="RS-485/RS-422 full duplex, 12 Мбит/с; DC-DC. Внешние соединения GNDIO/GND1, VISOOUT/VISOIN, GISOIN/GND2 — по TI.", OperatingTemperatureMin=-40, StorageTemperatureMax=150, Type=Микросхема
L1: library part L0005, "Ферритовый фильтр MPZ2012S601AT000", DCResistanceMaxOhm=0.1, Manufacturer=TDK, MPN=MPZ2012S601AT000, OperatingTemperatureMax=125, OperatingTemperatureMin=-55, Package=0805, RatedCurrentA=2, SimulationDCBiasCurrentA=0, SimulationReferenceTemperatureC=25, TemperatureReference="Component temperature including self-heating, °C; current derating above 85°C", TestFrequencyMHz=100, Tolerance=±25%, CommentBase="Ферритовый фильтр MPZ2012S601AT000", ComponentLink1Description="Даташит — локальный", ComponentLink1URL=C:\Users\Nomatin\Documents\Altium\MY_LIB\MY_LIB\Datasheets\Ferrite_Beads\TDK_MPZ2012_commercial.pdf, ComponentLink2Description="Даташит — производитель", ComponentLink2URL=https://product.tdk.com/en/system/files/dam/doc/product/emc/emc/beads/catalog/beads_commercial_power_mpz2012_en.pdf, Datasheet=C:\Users\Nomatin\Documents\Altium\MY_LIB\MY_LIB\Datasheets\Ferrite_Beads\TDK_MPZ2012_commercial.pdf, DatasheetRevision=2019-04-24, ESKD_value="600 Ом @ 100 МГц", Family=MPZ2012S, Grade=Commercial, HelpURL=C:\Users\Nomatin\Documents\Altium\MY_LIB\MY_LIB\Datasheets\Ferrite_Beads\TDK_MPZ2012_commercial.pdf, ID=L0005, ImpedanceOhm=600, Notes="Неполярный; выводы 1–2. Импеданс при 100 МГц; DCR — начальное максимальное значение. Ток номинальный при температуре компонента до 85 °C; выше — снижение по графику. Температура включает саморазогрев.", Packaging="180 mm paper tape", PackagingQuantity=4000, SimulationModelSource="MY_LIB; S-parameters and sampled TDK Precise outputs", SimulationModelType="Independent passive black-box RLC", SimulationSignalCondition="Small signal", Type="Ферритовый фильтр"
L2 L3: library part L0028, "Ферритовый фильтр BLM21PG331SN1D", DCResistanceMaxOhm=0.07, Manufacturer=Murata, MPN=BLM21PG331SN1D, OperatingTemperatureMax=125, OperatingTemperatureMin=-55, Package=0805, RatedCurrent125CA=1, RatedCurrentA=1.5, SimulationDCBiasCurrentA=0, SimulationReferenceTemperatureC=25, TemperatureReference="TA, °C; rated current at 85°C / 125°C", TestFrequencyMHz=100, Tolerance=±25%, CommentBase="Ферритовый фильтр BLM21PG331SN1D", ComponentLink1Description="Даташит — локальный", ComponentLink1URL=C:\Users\Nomatin\Documents\Altium\MY_LIB\MY_LIB\Datasheets\Ferrite_Beads\Murata_ENFA0005.pdf, ComponentLink2Description="Даташит — производитель", ComponentLink2URL=https://www.murata.com/products/productdata/8796738977822/ENFA0005.pdf, Datasheet=C:\Users\Nomatin\Documents\Altium\MY_LIB\MY_LIB\Datasheets\Ferrite_Beads\Murata_ENFA0005.pdf, DatasheetRevision=JENF243A_0005AE-01, ESKD_value="330 Ом @ 100 МГц", Family=BLM21PG, Grade=Consumer/industrial, HelpURL=C:\Users\Nomatin\Documents\Altium\MY_LIB\MY_LIB\Datasheets\Ferrite_Beads\Murata_ENFA0005.pdf, ID=L0028, ImpedanceOhm=330, Notes="Неполярный; выводы 1–2. Импеданс при 100 МГц; DCR — начальное максимальное значение. Ток указан при TA=85 °C, отдельное поле — при TA=125 °C; выше 85 °C требуется снижение тока. Ширину подводящей меди выбирать по даташиту с учётом тока и толщины меди.", Packaging="180 mm paper tape", PackagingQuantity=4000, SimulationModelSource="MY_LIB; sampled Murata SPICE outputs; S-parameter comparison", SimulationModelType="Independent passive black-box RLC", SimulationSignalCondition="Small signal", Type="Ферритовый фильтр"
R1 R2: library part R0243, "Резистор 5,1 кОм ±5% 0805", Manufacturer=YAGEO, MPN=RC0805JR-075K1L, Package=0805, Power="0,125 Вт", Tolerance=±5%, Voltage="150 В макс.", CommentBase="Резистор 5,1 кОм ±5% 0805", ComponentLink1Description="Даташит — локальный", ComponentLink1URL=C:\Users\Nomatin\Documents\Altium\MY_LIB\MY_LIB\Datasheets\YAGEO_RC_L.pdf, ComponentLink2Description="Даташит — производитель", ComponentLink2URL=https://yageogroup.com/content/datasheet/asset/file/PYU-RC_GROUP_51_ROHS_L, Datasheet=C:\Users\Nomatin\Documents\Altium\MY_LIB\MY_LIB\Datasheets\YAGEO_RC_L.pdf, ESKD_value="5,1 кОм", HelpURL=C:\Users\Nomatin\Documents\Altium\MY_LIB\MY_LIB\Datasheets\YAGEO_RC_L.pdf, ID=R0243, Notes="RC_L; E24; P при 70 °C; SPICE: +100 ppm/°C при 25 °C — положительная граница ±100, не измеренный ТКС (RC_L, табл.2/5, стр.5/8).", TCR="±100 ppm/°C", Type=Резистор
R3: library part R0214, "Резистор 330 Ом ±5% 0805", Manufacturer=YAGEO, MPN=RC0805JR-07330RL, Package=0805, Power="0,125 Вт", Tolerance=±5%, Voltage="150 В макс.", CommentBase="Резистор 330 Ом ±5% 0805", ComponentLink1Description="Даташит — локальный", ComponentLink1URL=C:\Users\Nomatin\Documents\Altium\MY_LIB\MY_LIB\Datasheets\YAGEO_RC_L.pdf, ComponentLink2Description="Даташит — производитель", ComponentLink2URL=https://yageogroup.com/content/datasheet/asset/file/PYU-RC_GROUP_51_ROHS_L, Datasheet=C:\Users\Nomatin\Documents\Altium\MY_LIB\MY_LIB\Datasheets\YAGEO_RC_L.pdf, ESKD_value="330 Ом", HelpURL=C:\Users\Nomatin\Documents\Altium\MY_LIB\MY_LIB\Datasheets\YAGEO_RC_L.pdf, ID=R0214, Notes="RC_L; E24; P при 70 °C; SPICE: +100 ppm/°C при 25 °C — положительная граница ±100, не измеренный ТКС (RC_L, табл.2/5, стр.5/8).", TCR="±100 ppm/°C", Type=Резистор
R4 R6: library part R0250, "Резистор 10 кОм ±5% 0805", Manufacturer=YAGEO, MPN=RC0805JR-0710KL, Package=0805, Power="0,125 Вт", Tolerance=±5%, Voltage="150 В макс.", CommentBase="Резистор 10 кОм ±5% 0805", ComponentLink1Description="Даташит — локальный", ComponentLink1URL=C:\Users\Nomatin\Documents\Altium\MY_LIB\MY_LIB\Datasheets\YAGEO_RC_L.pdf, ComponentLink2Description="Даташит — производитель", ComponentLink2URL=https://yageogroup.com/content/datasheet/asset/file/PYU-RC_GROUP_51_ROHS_L, Datasheet=C:\Users\Nomatin\Documents\Altium\MY_LIB\MY_LIB\Datasheets\YAGEO_RC_L.pdf, ESKD_value="10 кОм", HelpURL=C:\Users\Nomatin\Documents\Altium\MY_LIB\MY_LIB\Datasheets\YAGEO_RC_L.pdf, ID=R0250, Notes="RC_L; E24; P при 70 °C; SPICE: +100 ppm/°C при 25 °C — положительная граница ±100, не измеренный ТКС (RC_L, табл.2/5, стр.5/8).", TCR="±100 ppm/°C", Type=Резистор
R5: library part R0005, "Резистор 0 Ом 0805", Manufacturer=YAGEO, MPN=RC0805JR-070RL, Package=0805, Power="0,125 Вт", CommentBase="Резистор 0 Ом 0805", ComponentLink1Description="Даташит — локальный", ComponentLink1URL=C:\Users\Nomatin\Documents\Altium\MY_LIB\MY_LIB\Datasheets\YAGEO_RC_L.pdf, ComponentLink2Description="Даташит — производитель", ComponentLink2URL=https://yageogroup.com/content/datasheet/asset/file/PYU-RC_GROUP_51_ROHS_L, Datasheet=C:\Users\Nomatin\Documents\Altium\MY_LIB\MY_LIB\Datasheets\YAGEO_RC_L.pdf, ESKD_value="0 Ом", HelpURL=C:\Users\Nomatin\Documents\Altium\MY_LIB\MY_LIB\Datasheets\YAGEO_RC_L.pdf, ID=R0005, Notes="Перемычка RC_L; R < 50 мОм; номинальный ток 2 А; J — код заказа перемычки, процентный допуск не применяется. Источник: https://www.yageogroup.com/content/datasheet/asset/file/PYU-RC_GROUP_51_ROHS_L; SPICE: ТКС перемычек не указан в RC_L; R=0,05 Ом сохранено, температурная зависимость не моделируется.", TCR="Не указан", Type=Резистор
R7: library part R0204, "Резистор 120 Ом ±5% 0805", Manufacturer=YAGEO, MPN=RC0805JR-07120RL, Package=0805, Power="0,125 Вт", Tolerance=±5%, Voltage="150 В макс.", CommentBase="Резистор 120 Ом ±5% 0805", ComponentLink1Description="Даташит — локальный", ComponentLink1URL=C:\Users\Nomatin\Documents\Altium\MY_LIB\MY_LIB\Datasheets\YAGEO_RC_L.pdf, ComponentLink2Description="Даташит — производитель", ComponentLink2URL=https://yageogroup.com/content/datasheet/asset/file/PYU-RC_GROUP_51_ROHS_L, Datasheet=C:\Users\Nomatin\Documents\Altium\MY_LIB\MY_LIB\Datasheets\YAGEO_RC_L.pdf, ESKD_value="120 Ом", HelpURL=C:\Users\Nomatin\Documents\Altium\MY_LIB\MY_LIB\Datasheets\YAGEO_RC_L.pdf, ID=R0204, Notes="RC_L; E24; P при 70 °C; SPICE: +100 ppm/°C при 25 °C — положительная граница ±100, не измеренный ТКС (RC_L, табл.2/5, стр.5/8).", TCR="±100 ppm/°C", Type=Резистор
R8: library part R0258, "Резистор 22 кОм ±5% 0805", Manufacturer=YAGEO, MPN=RC0805JR-0722KL, Package=0805, Power="0,125 Вт", Tolerance=±5%, Voltage="150 В макс.", CommentBase="Резистор 22 кОм ±5% 0805", ComponentLink1Description="Даташит — локальный", ComponentLink1URL=C:\Users\Nomatin\Documents\Altium\MY_LIB\MY_LIB\Datasheets\YAGEO_RC_L.pdf, ComponentLink2Description="Даташит — производитель", ComponentLink2URL=https://yageogroup.com/content/datasheet/asset/file/PYU-RC_GROUP_51_ROHS_L, Datasheet=C:\Users\Nomatin\Documents\Altium\MY_LIB\MY_LIB\Datasheets\YAGEO_RC_L.pdf, ESKD_value="22 кОм", HelpURL=C:\Users\Nomatin\Documents\Altium\MY_LIB\MY_LIB\Datasheets\YAGEO_RC_L.pdf, ID=R0258, Notes="RC_L; E24; P при 70 °C; SPICE: +100 ppm/°C при 25 °C — положительная граница ±100, не измеренный ТКС (RC_L, табл.2/5, стр.5/8).", TCR="±100 ppm/°C", Type=Резистор
R9: library part R0266, "Резистор 47 кОм ±5% 0805", Manufacturer=YAGEO, MPN=RC0805JR-0747KL, Package=0805, Power="0,125 Вт", Tolerance=±5%, Voltage="150 В макс.", CommentBase="Резистор 47 кОм ±5% 0805", ComponentLink1Description="Даташит — локальный", ComponentLink1URL=C:\Users\Nomatin\Documents\Altium\MY_LIB\MY_LIB\Datasheets\YAGEO_RC_L.pdf, ComponentLink2Description="Даташит — производитель", ComponentLink2URL=https://yageogroup.com/content/datasheet/asset/file/PYU-RC_GROUP_51_ROHS_L, Datasheet=C:\Users\Nomatin\Documents\Altium\MY_LIB\MY_LIB\Datasheets\YAGEO_RC_L.pdf, ESKD_value="47 кОм", HelpURL=C:\Users\Nomatin\Documents\Altium\MY_LIB\MY_LIB\Datasheets\YAGEO_RC_L.pdf, ID=R0266, Notes="RC_L; E24; P при 70 °C; SPICE: +100 ppm/°C при 25 °C — положительная граница ±100, не измеренный ТКС (RC_L, табл.2/5, стр.5/8).", TCR="±100 ppm/°C", Type=Резистор
R10: library part R0226, "Резистор 1 кОм ±5% 0805", Manufacturer=YAGEO, MPN=RC0805JR-071KL, Package=0805, Power="0,125 Вт", Tolerance=±5%, Voltage="150 В макс.", CommentBase="Резистор 1 кОм ±5% 0805", ComponentLink1Description="Даташит — локальный", ComponentLink1URL=C:\Users\Nomatin\Documents\Altium\MY_LIB\MY_LIB\Datasheets\YAGEO_RC_L.pdf, ComponentLink2Description="Даташит — производитель", ComponentLink2URL=https://yageogroup.com/content/datasheet/asset/file/PYU-RC_GROUP_51_ROHS_L, Datasheet=C:\Users\Nomatin\Documents\Altium\MY_LIB\MY_LIB\Datasheets\YAGEO_RC_L.pdf, ESKD_value="1 кОм", HelpURL=C:\Users\Nomatin\Documents\Altium\MY_LIB\MY_LIB\Datasheets\YAGEO_RC_L.pdf, ID=R0226, Notes="RC_L; E24; P при 70 °C; SPICE: +100 ppm/°C при 25 °C — положительная граница ±100, не измеренный ТКС (RC_L, табл.2/5, стр.5/8).", TCR="±100 ppm/°C", Type=Резистор
R11: library part R0242, "Резистор 4,7 кОм ±5% 0805", Manufacturer=YAGEO, MPN=RC0805JR-074K7L, Package=0805, Power="0,125 Вт", Tolerance=±5%, Voltage="150 В макс.", CommentBase="Резистор 4,7 кОм ±5% 0805", ComponentLink1Description="Даташит — локальный", ComponentLink1URL=C:\Users\Nomatin\Documents\Altium\MY_LIB\MY_LIB\Datasheets\YAGEO_RC_L.pdf, ComponentLink2Description="Даташит — производитель", ComponentLink2URL=https://yageogroup.com/content/datasheet/asset/file/PYU-RC_GROUP_51_ROHS_L, Datasheet=C:\Users\Nomatin\Documents\Altium\MY_LIB\MY_LIB\Datasheets\YAGEO_RC_L.pdf, ESKD_value="4,7 кОм", HelpURL=C:\Users\Nomatin\Documents\Altium\MY_LIB\MY_LIB\Datasheets\YAGEO_RC_L.pdf, ID=R0242, Notes="RC_L; E24; P при 70 °C; SPICE: +100 ppm/°C при 25 °C — положительная граница ±100, не измеренный ТКС (RC_L, табл.2/5, стр.5/8).", TCR="±100 ppm/°C", Type=Резистор
SA1: library part SA0001, "Переключатель DS1040-01RT", CurrentRating="100 мА", Manufacturer=CONNFLY, OperatingTemperatureMax=105, OperatingTemperatureMin=-40, Package="Piano DIP, THT, 2 вывода", TemperatureReference="Temperature Range, °C; DS1040 sheet 3", Voltage="24 В AC/DC", CommentBase="Переключатель DS1040-01RT", ComponentLink1Description="Даташит — локальный", ComponentLink1URL=C:\Users\Nomatin\Documents\Altium\MY_LIB\MY_LIB\Datasheets\CONNFLY_DS1040_series.pdf, ComponentLink2Description="Даташит — производитель", ComponentLink2URL=https://www.connfly.com/static/upload/file/pdf/DS1040.pdf, ContactForm=SPST, Datasheet=C:\Users\Nomatin\Documents\Altium\MY_LIB\MY_LIB\Datasheets\CONNFLY_DS1040_series.pdf, DatasheetRevision="C-DS1040-01XT-E, Rev. E, 05.07.2019", ESKD_value=DS1040-01RT, HelpURL=C:\Users\Nomatin\Documents\Altium\MY_LIB\MY_LIB\Datasheets\CONNFLY_DS1040_series.pdf, ID=SA0001, MPN=DS1040-01RT, Notes="1 позиция SPST Piano; красный корпус. 3D-модель приблизительная: см. REVIEW.md в папке footprint.", Positions=1, Type=Переключатель
TP1 TP2 TP3 TP4 TP5 TP6 TP7 TP8: library part TP0002, "Контрольная точка Площадка Ø1,5 мм", Package="Площадка Ø1,5 мм", CommentBase="Контрольная точка Площадка Ø1,5 мм", ComponentType="Standard (No BOM)", DiameterMm=1.5, ESKD_value=D1.5mm, ID=TP0002, Notes="Одна круглая площадка Top Layer; маска открыта +0,05 мм; без отверстия, пасты и шелкографии. Standard (No BOM).", Standard="GOST 2.721-74, Table 6a, item 7", Type="Контрольная точка"
VD1 VD2 VD3: library part HL0009, "Светодиод Чистый зелёный 3,2В 705мкд 0805", Color="Чистый зелёный", ForwardVoltageMaxV=3.6, ForwardVoltageTypicalV=3.2, Manufacturer=Oasistek, Package=0805, TestCurrentMa=20, Voltage="3,2 В (тип., IF=20 мА)", ChipMaterial=InGaN, CommentBase="Светодиод Чистый зелёный 3,2В 705мкд 0805", ComponentLink1Description="Даташит — локальный", ComponentLink1URL=C:\Users\Nomatin\Documents\Altium\MY_LIB\MY_LIB\Datasheets\Oasistek_LED\TO-2013BC-PG.pdf, ComponentLink2Description="Даташит — производитель", ComponentLink2URL=https://www.oasistek.com/upload/2021_SMD_Lamp_Catalogue.pdf, Datasheet=C:\Users\Nomatin\Documents\Altium\MY_LIB\MY_LIB\Datasheets\Oasistek_LED\TO-2013BC-PG.pdf, DatasheetRevision="Параметры: каталог 2021, стр.19–20; пины: Rev. A-1; 2017-06-09; GS1706012", ESKD_value=TO-2013BC-PG, Family=TO-2013BC, HelpURL=C:\Users\Nomatin\Documents\Altium\MY_LIB\MY_LIB\Datasheets\Oasistek_LED\TO-2013BC-PG.pdf, ID=HL0009, IntensityMinMcd=321, IntensityTypicalMcd=705, LED_IS=8.21368101376E-51, LED_N=1, LED_RS=13.4860774673, MPN=TO-2013BC-PG, Notes="VF/IV: каталог 2021, IF=20 мА. Площадки по даташиту: 0,80×1,20; зазор 0,90 мм. 1=K, 2=A. Типовая 3D, не точный CAD Oasistek.", PinMapping="1=C (K), 2=A", Type=Светодиод, ViewingAngleDeg=120, WavelengthNm=525
XS1: library part XS0001, "Разъём USB Type-C USB4110-GF-A", Manufacturer=GCT, MPN=USB4110-GF-A, Package="USB Type-C, SMT", CommentBase="Разъём USB Type-C USB4110-GF-A", ComponentLink1Description="Даташит — локальный", ComponentLink1URL=C:\Users\Nomatin\Documents\Altium\MY_LIB\MY_LIB\Datasheets\GCT_USB4110\USB4110_drawing.pdf, ComponentLink2Description="Даташит — производитель", ComponentLink2URL=https://gct.co/files/drawings/usb4110.pdf, Datasheet=C:\Users\Nomatin\Documents\Altium\MY_LIB\MY_LIB\Datasheets\GCT_USB4110\USB4110_drawing.pdf, DatasheetRevision="B4, 22.05.2024", ESKD_value="USB Type-C", HelpURL=C:\Users\Nomatin\Documents\Altium\MY_LIB\MY_LIB\Datasheets\GCT_USB4110\USB4110_drawing.pdf, ID=XS0001, Notes="USB 2.0; 12 сигнальных выводов + SH; 4 площадки корпуса SH", PinA1_B12_Name=GND, PinA4_B9_Name=VBUS, PinA5_Name=CC1, PinA6_Name=D1+, PinA7_Name=D1-, PinA8_Name=SBU1, PinA9_B4_Name=VBUS, PinA12_B1_Name=GND, PinB5_Name=CC2, PinB6_Name=D2+, PinB7_Name=D2-, PinB8_Name=SBU2, PinSH_Name=SHELL, Type=Разъём
XS2: library part XS0002, "Разъём D-SUB 9F DS1037-01-09F", Manufacturer=CONNFLY, MPN=DS1037-01-09F, Package="D-SUB-9, угловая розетка, THT", CommentBase="Разъём D-SUB 9F DS1037-01-09F", ComponentLink1Description="Даташит — локальный", ComponentLink1URL=C:\Users\Nomatin\Documents\Altium\MY_LIB\MY_LIB\Datasheets\CONNFLY_DS1037-01.pdf, ComponentLink2Description="Даташит — производитель", ComponentLink2URL=https://www.connfly.com/static/upload/file/pdf/DS1037-01.pdf, Datasheet=C:\Users\Nomatin\Documents\Altium\MY_LIB\MY_LIB\Datasheets\CONNFLY_DS1037-01.pdf, DatasheetRevision="C, 08.08.2017", ESKD_value="D-SUB 9F", HelpURL=C:\Users\Nomatin\Documents\Altium\MY_LIB\MY_LIB\Datasheets\CONNFLY_DS1037-01.pdf, ID=XS0002, Notes="Контакты 1–9. Два крепления NPTH без электрического подключения. STEP пользователя встроен. См. REVIEW.md.", Pin1_Name=Common, Pin2_Name=Name, Pin3_Name=Name, Pin4_Name=Name, Pin5_Name="D1 (B)", Pin6_Name=Name, Pin7_Name=Name, Pin8_Name=Name, Pin9_Name="D0 (A)", Type=Разъём

## Free pads (board coordinates)
  round 4 hole 3.2: 2(53,93) 2(53,113) 2(94.5,113) 2(105,93) 2(105,113) 2(120.5,87) 2(120.5,119)

## Via types
v1: diameter 0.8, hole 0.4, Top Layer to Bottom Layer, 43 vias

## Nets (pads, with @x,y where several pads share a name; then routed paths per layer and width w, separated by ;. In a path a pad name is that pad's centre, name@x,y a point inside that pad or via, vN(x,y) a via of type N, cw(c..) or ccw(c..) an arc to the next point about the centre after c; other vN are vias at no path point)
D_N: D1.4 D3.4 | length 8.3
  Top Layer w0.15: 73.103,102.24 73.138,102.206
  Top Layer w0.3: 73.138,102.206 D3.4@74.394,102.206
  Top Layer w0.381: D1.4 66.71,102.16 67.372,102.16 67.895,102.683 72.661,102.683 73.103,102.24
D_P: D1.6 D3.3 | length 8.3
  Top Layer w0.3: 73.55,102.7 D3.3
  Top Layer w0.381: D1.6 66.71,103.841 67.409,103.841 67.932,103.318 72.932,103.318 73.55,102.7
EN_DC: D4.8 R5.2 R11.1 TP7.1 | length 14
  Top Layer w0.25: D4.8 95.566,99.425 96.4,98.591 96.4,95.25 95.2,94.05 R11.1
  Top Layer w0.3: R5.2 TP7.1 93.492,99.458 94.783,99.458 D4.8
GND: C1.1 C2.1 C3.1 C4.1 C5.1 C6.1 C7.1 C8.1 C9.1 D1.2 D3.2 D3.25 D4.6 D4.10 pad.2@53,93 pad.2@53,113 pad.2@94.5,113 R1.2 R2.1 R9.1 VD1.1 XS1.A1/B12 XS1.A12/B1 XS1.SH | length 9.3
  Top Layer w0.25: 73.5,103.75 73.5,103.565 73.851,103.215 74.385,103.215 74.425,103.175 74.817,103.175 74.986,103.175 75.836,102.325 D3.25@76.35,102.325
  Top Layer w0.3: 65.5,103.684 65.5,104.25
  Top Layer w0.4: XS1.A12/B1 XS1.A12/B1@57.817,99.8 ; 58.5,98.75 58.5,99.117
  Top Layer w0.5: D1.2@64.6,103 D1.2 64.35,103.05 64.936,103.05 65.5,103.614 65.5,103.684
  Top Layer w0.6: C5.1 70.075,99.45 C5.1@70.275,99.65 ; C4.1@70.95,101 C4.1 ; v1@92.75,102 v1(92.785,101.965) D4.6
  other v1: 96.5,90.9 68.1,92.9 88.7,94 91.2,94 73.9,94.3 76.1,94.3 78.3,94.3 80.5,94.3 87.6,95.1 90,95.1 92.3,95.1 68.5,97.9 64.6,98.1 63.2,98.7 68.5,98.9 63.2,100.1 68.9,101.1 84.7,101.5 73.2,104.3 89.5,104.7 74,105.5 78.5,105.6 85.1,106.1 62.2,106.4 75.1,107.6 88.8,108.3 81.4,109.6 85,109.7 89.3,109.7
GND_ISO: C10.1 C13.1 D2.3 D4.15 L3.1 pad.2@105,93 pad.2@105,113 pad.2@120.5,87 pad.2@120.5,119 XS2.1
  other v1: 115.3,94.7 117.8,94.7 117.8,96.2 122,99 120.6,100.4 107.3,101.1 111.244,101.197 102.4,101.9 111.2,102.6
NetC11_1: C11.1 C12.1 C14.1 D4.11 L3.2 | length 9.3
  Top Layer w0.6: D4.11 106.815,96.885 107.25,96.45 C11.1 113.45,96.45 L3.2
NetD3_1: D3.1
NetD3_11: D3.11
NetD3_17: D3.17
NetD3_18: D3.18
NetD3_19: D3.19
NetD3_22: D3.22
NetD3_23: D3.23
NetD3_24: D3.24
NetD4_7: D4.7
NetD4_14: D4.14
NetR1_1: R1.1 XS1.A5 | length 2.7
  Top Layer w0.3: XS1.A5 57.552,104.252 58.201,104.252 58.698,104.75 R1.1
NetR2_2: R2.2 XS1.B5 | length 2.8
  Top Layer w0.3: XS1.B5 57.552,101.248 58.501,101.248 58.553,101.195 59.8,101.195 60.05,100.945 R2.2
NetR3_2: R3.2 VD1.2 | length 3.4
  Top Layer w0.6: R3.2 73.375,109.325 76.68,109.325 VD1.2
NetR4_2: R4.2 VD2.1 | length 3.7
  Top Layer w0.3: R4.2 82.75,107.419 82.981,107.65 VD2.1
NetR6_2: R6.2 VD3.1 | length 3.8
  Top Layer w0.3: VD3.1 79.895,107.65 80.35,107.195 R6.2
NetR7_1: R7.1 SA1.1 | length 9.3
  Top Layer w0.6: R7.1 124.15,92.3 129.45,87 SA1.1
RS485: D3.12 D4.3 D4.5 TP5.1 | length 26.1
  Top Layer w0.3: D3.12 87.6,100.5 87.95,100.85 87.95,103.059 ; TP5.1 87.95,103.059 ; D4.3 95.566,105.775 96.166,105.175 96.166,103.835 95.566,103.235 D4.5 88.126,103.235 87.95,103.059
RS485_N: D2.2 D4.18 D4.19 SA1.2 XS2.9 | length 47.4
  Top Layer w0.381: D4.19 D4.18 105.266,105.775 105.57,105.471 105.914,105.471 106.568,106.126 118.554,106.126 123.272,101.407 123.993,101.407 D2.2 124.26,101.141 124.26,100.966 124.483,100.743 125.28,100.743 125.872,101.334 126.714,101.334 126.958,101.09 XS2.9 138.6,92.41 SA1.2
RS485_P: D2.1 D4.17 D4.20 R7.2 XS2.5 | length 39.6
  Top Layer w0.381: D4.20 103.766,108.315 103.126,107.675 103.126,105.145 103.766,104.505 D4.17 105.266,104.505 105.597,104.836 106.177,104.836 106.831,105.491 118.291,105.491 123.79,99.991 123.79,99.71 D2.1 124.26,99.71 124.26,99.884 124.483,100.108 125.543,100.108 126.135,100.699 126.451,100.699 126.674,100.476 126.674,100.441 127.08,100.035 XS2.5 127.08,97.48 124.36,94.76 124.36,94.51 124.15,94.3 R7.2
RSTb: D3.9 R10.1 | length 8.1
  Top Layer w0.3: D3.9 76.1,100.001 76.601,99.5 77.35,99.5 78.25,98.6 81.25,98.6 82.4,97.45 R10.1
RXD: D3.20 D4.4 TP6.1 | length 21.9
  Top Layer w0.2: D3.20 77.1,106.039 79.361,108.3 85.55,108.3 87.489,106.361 89.889,106.361 TP6.1 92.302,105 92.797,104.505 D4.4
RXT: D3.13 R4.1 | length 5.2
  Top Layer w0.3: D3.13 82.574,101.2 82.75,101.376 R4.1
SYSb: D3.15 R5.1 TP2.1 | length 10.2
  Top Layer w0.3: D3.15 78.799,102.2 79.699,103.1 86.65,103.1 86.95,102.8 R5.1
TXD: D3.21 D4.2 TP4.1 | length 21.6
  Top Layer w0.2: D3.21 76.6,106.034 79.216,108.65 85.838,108.65 86.619,107.869 87.443,107.045 D4.2
TXT: D3.14 R6.1 | length 2.2
  Top Layer w0.3: D3.14 78.936,101.7 79.336,102.1 R6.1
USB_D_N: D1.3 XS1.A7 XS1.B7 | length 9.3
  Top Layer w0.3: XS1.A7 57.548,102.752 56.899,102.752 56.679,102.973 56.679,103.527 56.899,103.748 XS1.B7 XS1.B7 ; XS1.A7@57.782,102.725 58.49,102.725 58.533,102.683 58.65,102.683
  Top Layer w0.381: 58.65,102.683 61.059,102.683 63.118,102.683 63.641,102.16 64.191,102.16 D1.3
USB_D_P: D1.1 XS1.A6 XS1.B6 | length 16.1
  Top Layer w0.3: XS1.B6 58.294,102.25 58.419,102.125 58.478,102.125 58.708,101.895 v1(58.843,101.895) ; XS1.A6 58.783,103.25 58.85,103.318 58.85,103.912 v1(58.869,103.931)
  Top Layer w0.381: 58.85,103.318 61.322,103.318 63.118,103.318 63.641,103.841 64.191,103.841 D1.1